# Altium PCB PCB_Gateway.PcbDoc (part 2 of 2)
Units mm, origin at the board's own origin, x right, y up, seen from the top; angles counter-clockwise.
Board outline 107.98 x 107.96 mm, 2 copper layers (Top Layer, Bottom Layer); 168 components, 117 nets, 706 pads, 81 vias.
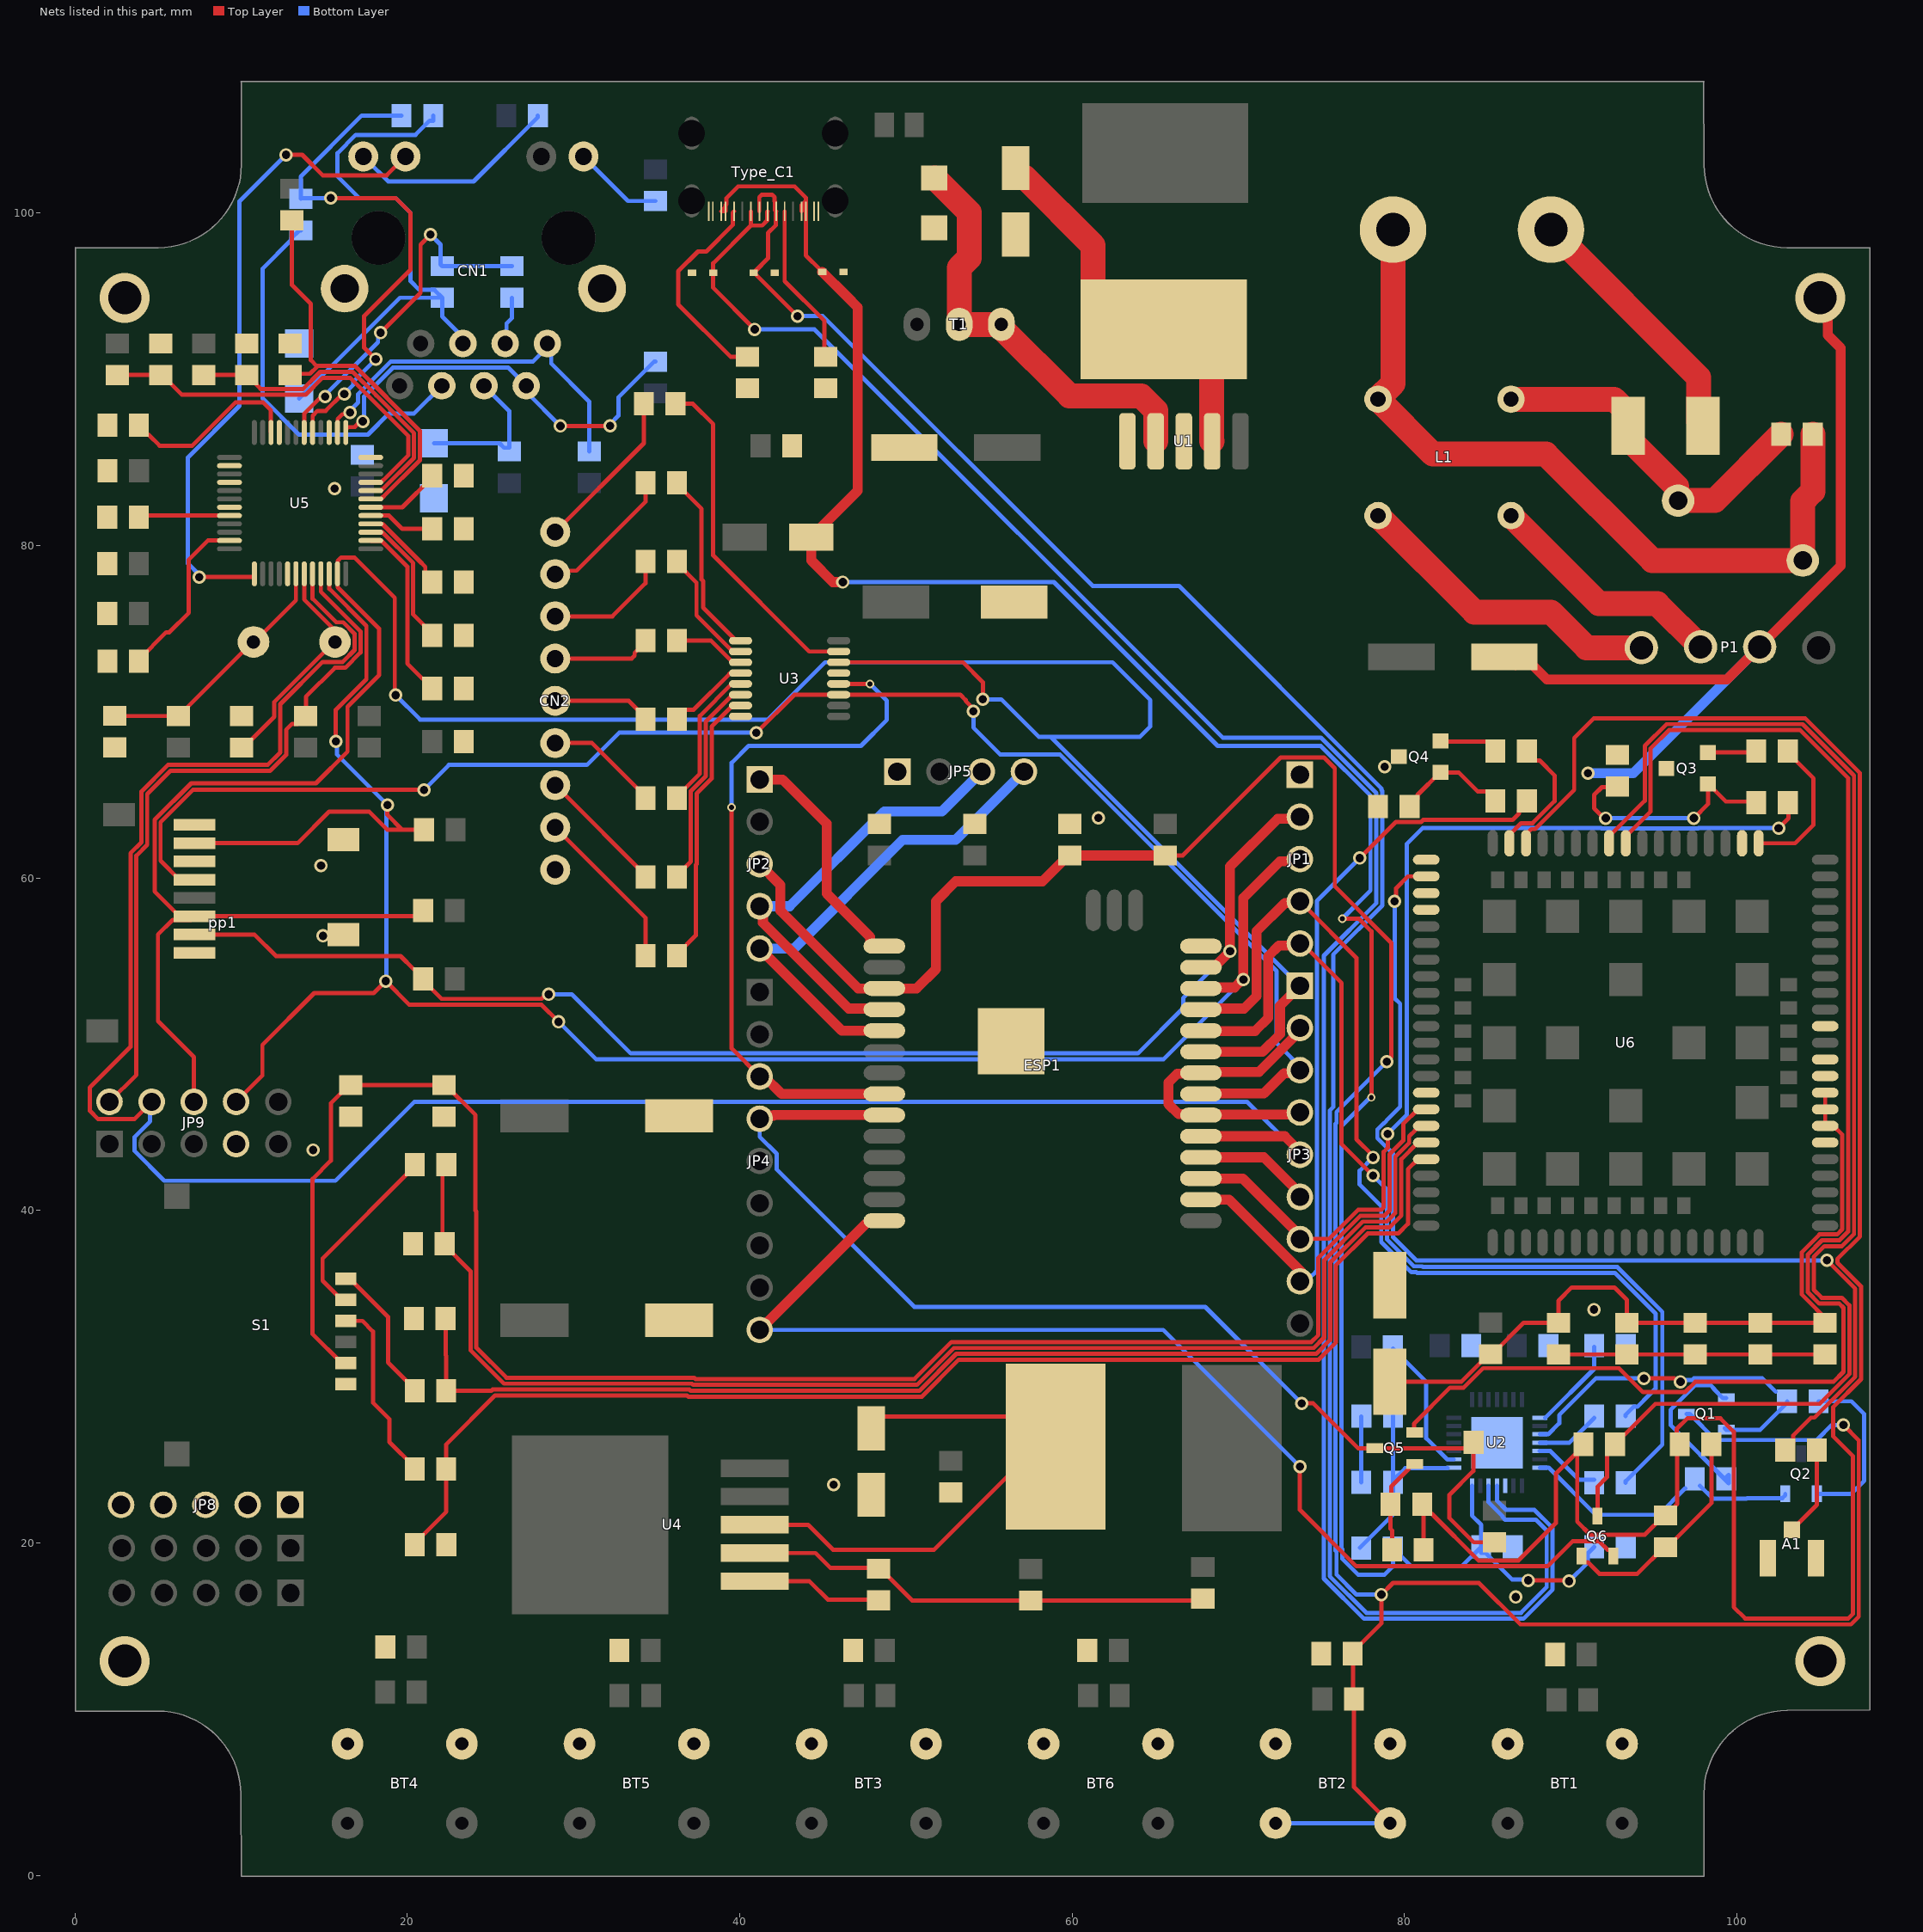
[diagram p2: the nets of this part, all layers, seen from the top]

## Via types
v1: diameter 0.8, hole 0.5, Top Layer to Bottom Layer, tented both sides, 68 vias
v2: diameter 0.5, hole 0.3, Top Layer to Bottom Layer, tented both sides, 9 vias
v3: diameter 3, hole 2, Top Layer to Bottom Layer, tented both sides, 4 vias

## Nets (pads, with @x,y where several pads share a name; then routed paths per layer and width w, separated by ;. In a path a pad name is that pad's centre, name@x,y a point inside that pad or via, vN(x,y) a via of type N, cw(c..) or ccw(c..) an arc to the next point about the centre after c; other vN are vias at no path point) (continued)
CHIP_PU/EN: BT2.2 C6.1 C23.2 ESP1.3 JP2.3 Q1.3 R1.1 R40.1 | length 176.6
  Top Layer w0.254: R1.1@65.599,61.356 R1.1@65.6,61.357 66.657,61.357 72.547,67.247 75.153,67.247 75.8,66.6 75.8,59.5 79.2,56.1 79.2,49.221 v1(78.927,48.948) ; BT2.2@72.24,3.153 BT2.2@72.347,3.153 ; R40.1@76.879,10.471 76.95,10.4 76.95,5.326 78.747,3.529 78.747,3.153 BT2.2@79.123,3.153 ; C23.2@76.879,13.346 76.9,13.325 76.9,10.673 R40.1@76.95,10.623 ; C23.2@76.879,13.446 78.6,15.168 v1(78.6,16.9) 79.3,17.6 84.466,17.6 86.96,15.106 106.846,15.106 107.32,15.58 107.32,26.18 v1(106.4,27.1)
  Top Layer w0.6: JP2.3@41.2,60.84 42.45,59.59 42.45,58.04 47.13,53.36 50.64,53.36 51.8,54.52 51.8,58.6 53,59.8 58.209,59.8 59.763,61.354 C6.1@59.863,61.354 C6.1@59.863,61.354 R1.1@65.599,61.356
  Bottom Layer w0.254: JP2.3@41.14,60.84 JP2.3@41.2,60.84 ; BT2.2@72.24,3.153 BT2.2@79.123,3.153 ; v1(78.6,16.9) 77.102,16.9 75.9,18.102 75.9,19.476 75.846,19.53 75.846,45.213 75.9,45.267 75.9,45.921 v1(78.927,48.948) ; Q1.3@96.949,27.764 97.149,27.764 98.714,26.2 104.8,26.2 105.7,27.1 v1(106.4,27.1)
DTR: Q2.2 R14.1 U2.28 | length 16.2
  Bottom Layer w0.254: U2.28@88.139,24.538 88.662,24.538 91.5,21.7 95.294,21.7 R14.1@96.881,23.288 ; R14.1@97.761,23.454 98.546,22.669 100.569,22.669 100.6,22.7 102.726,22.7 102.899,22.873 Q2.2@102.899,22.964
ESP_PWRKEY: ESP1.17 JP3.7 R57.2 | length 60.4
  Top Layer w0.254: JP3.7@74,38.2 74.102,38.302 75.455,38.302 77.195,40.043 78.589,40.043 78.738,40.192 78.738,43.529 78.987,43.778 v1(78.987,44.613) ; v1(102.5,63) 103.09,63.59 R57.2@103.09,64.539
  Top Layer w0.6: ESP1.17@67.75,41.93 70.27,41.93 JP3.7@74,38.2
  Bottom Layer w0.254: v1(78.987,44.613) 80.14,45.767 80.14,62.06 81.08,63 91.813,63 91.84,62.973 97.66,62.973 97.687,63 v1(102.5,63)
ESP_RESET: ESP1.16 JP3.8 R58.2 | length 47.1
  Top Layer w0.254: JP3.8@73.509,35.931 JP3.8@73.7,35.74 ; v1(77.3,61.2) 79.473,63.373 80.994,63.373 81.121,63.5 86.5,63.5 86.881,63.881 86.881,64.066 86.954,64.139 R58.2@87.554,64.139
  Top Layer w0.6: ESP1.16@67.75,40.66 69.44,40.66 73.809,36.291 JP3.8@73.809,35.851
  Bottom Layer w0.254: JP3.8@74,35.676 74.455,36.131 74.471,36.131 74.727,36.387 74.727,58.627 v1(77.3,61.2)
GND: A1.3 A1.4 BT1.1 BT2.1 BT3.1 BT4.1 BT5.1 BT6.1 C1.2 C2.2 C4.2 C5.2 C6.2 C7.2 C8.1 C9.2 C10.2 C11.1 C13.2 C14.2 C15.2 C16.2 C17.2 C19.2 C20.2 C21.2 C22.1 C23.1 C24.1 C26.2 C27.1 C28.1 C29.1 C30.1 C31.1 C32.1 C33.2 C34.2 C35.2 C36.2 C37.2 C38.2 C39.2 C40.2 C41.2 C45.2 C46.2 C47.2 C48.2 C49.2 CN1.SHELL1 CN1.SHELL2 CN2.9 D2.1 D3.1 D4.1 D5.1 D6.1 ESP1.1 ESP1.28 ESP1.29 JP1.1 JP2.1 JP5.1 JP8.1 JP8.2 JP8.3 JP8.4 JP8.5 JP9.4 P1.2 pp1.1 pp1.6 pp1.8 pp1.9 pp1.10 Q3.2 Q4.2 R2.1 R3.1 R6.1 R26.1 R27.1 R29.2 R30.2 R31.2 R32.2 R33.2 R34.2 R35.1 R37.1 R48.1 R52.1 R59.2 R60.2 R68.1 S1.2 Type_C1.A1 Type_C1.A12 Type_C1.B1 Type_C1.B12 U1.3 U1.5 U2.3 U2.29 U3.8 U3.13 U4.1 U5.3 U5.9 U5.14 U5.16 U5.19 U5.29 U5.48 U6.2 U6.18 U6.29 U6.54 U6.58 U6.59 U6.61 U6.89 U6.91 | length 97.4
  Top Layer w0.254: U4.1@40.9,17.7 44.2,17.7 45.3,16.6 48.315,16.6 R68.1@48.361,16.554 ; C4.2@86,73.3 C4.2@86.673,72.627 ; C38.2@89.257,31.346 89.257,31.357 89.269,31.346 C37.2@93.367,31.346 C36.2@97.477,31.346 C40.2@105.697,31.346
  Top Layer w0.6: JP2.1@41.2,65.92 42.58,65.92 45.23,63.27 45.23,59.07 47.843,56.457 47.843,56.039 47.981,55.9 ESP1.1@48.7,55.9 ; C4.2@86,73.3 87.2,73.3 88.56,71.94 99.396,71.94 P1.2@101.356,73.9 106.24,78.784 106.24,91.88 105.459,92.661 105.459,94.441 v3(105,94.9)
  Bottom Layer w0.254: C19.2@77.395,23.661 R26.1@77.395,27.619
  Bottom Layer w0.6: v1(91.03,66.3) 93.756,66.3 P1.2@101.356,73.9
  other v1: 86.69,16.75 45.64,23.51 91.385,34.045 14.33,43.64 14.93,56.52 14.81,60.74 61.58,63.61 78.8,66.69 15.63,83.42
  other v3: 3,12.9 105,12.9 3,94.9
GNSS_ANT: C42.2 U6.90 | length 64.9
  Top Layer w0.254: v1(79.4,58.6) 79.481,58.681 79.481,59.381 80.2,60.1 U6.90@81.3,60.1 ; C42.2@102.9,25.6 103.365,26.065 103.365,26.465 104.446,27.546 104.647,27.546 107.108,30.007 107.108,35.292 v1(105.4,37)
  Bottom Layer w0.254: v1(79.4,58.6) 79.4,52.769 79.727,52.442 79.727,46.24 78.9,45.413 78.9,45.389 78.751,45.24 78.727,45.24 78.36,44.873 78.36,44.354 79.3,43.413 79.3,38.4 80.7,37 v1(105.4,37)
IO27: ESP1.18 JP3.6 | length 7.3
  Top Layer w0.6: ESP1.18@67.75,43.2 71.54,43.2 JP3.6@74,40.74
Latch: ESP1.8 JP4.3 U3.12 | length 42.4
  Top Layer w0.254: v2(39.51,64.249) 39.51,49.75 JP4.3@41.2,48.06 ; U3.12@45.95,71.675 v2(47.835,71.675)
  Top Layer w0.6: JP4.3@41.2,48.06 41.471,48.06 42.521,47.01 ESP1.8@48.7,47.01
  Bottom Layer w0.254: v2(39.51,64.249) 39.51,66.93 40.53,67.95 47.29,67.95 48.85,69.51 48.85,70.66 v2(47.835,71.675)
LINKLED: CN1.11 U5.25 | length 39.8
  Top Layer w0.254: v1(7.481,78.1) 10.779,78.1 10.8,78.121 U5.25@10.8,78.3 ; v1(12.7,103.5) 13.671,103.5 14.9,102.271 18.761,102.271 CN1.11@19.89,103.4
  Bottom Layer w0.254: v1(7.481,78.1) 7.481,78.241 6.8,78.922 6.8,85.3 9.9,88.4 9.9,100.7 v1(12.7,103.5)
NC: ESP1.20 ESP1.22 JP3.2 JP3.4 | length 19
  Top Layer w0.6: JP3.2@73.689,50.789 71.237,48.337 67.807,48.337 ESP1.22@67.75,48.28 67.693,48.223 66.323,48.223 65.8,47.7 65.8,46.4 66.403,45.797 67.693,45.797 ESP1.20@67.75,45.74 67.79,45.78 73.96,45.78 JP3.4@74,45.82
NetA1_2: A1.2 C42.1 | length 5.4
  Top Layer w0.254: A1.2@103.3,20.8 104.8,22.3 C42.1@104.8,25.6
NetC3_1: C3.1 F1.2 L1.3 MOV1.1 | length 21.8
  Top Layer w1.5: L1.3@86.4,88.8 92.6,88.8 93.45,87.95 F1.2@93.45,87.2 93.45,86.45 96.363,83.537 96.363,82.787 MOV1.1@96.45,82.7 98.658,82.7 C3.1@102.654,86.697
NetC3_2: C3.2 HB1.2 L1.1 MOV1.2 | length 48
  Top Layer w1.5: HB1.2@79.3,99 79.3,89.741 78.4,88.841 L1.1@78.4,88.8 81.7,85.5 88.5,85.5 94.9,79.1 MOV1.2@103.95,79.1 103.95,82.658 104.554,83.262 C3.2@104.554,86.697
NetC10_1: C10.1 U2.22 | length 5.5
  Bottom Layer w0.254: U2.22@88.462,27.538 91.404,30.479 C10.1@91.404,31.804
NetC19_1: C19.1 R24.2 R26.2 U2.8 | length 12.3
  Bottom Layer w0.254: R24.2@77.304,19.715 79.295,21.706 79.295,23.761 80.034,24.5 U2.8@82.599,24.5 ; C19.1@79.301,23.767 R26.2@79.301,27.625
NetC25_2: C25.2 R42.1 R68.2 U4.2 | length 28.2
  Top Layer w0.254: U4.2@40.9,19.4 44.562,19.4 45.462,18.5 48.315,18.5 R68.2@48.361,18.454 48.461,18.454 50.37,16.546 C25.2@57.497,16.546 67.752,16.546 R42.1@67.861,16.654
NetC34_1: C34.1 U5.20 | length 5.5
  Top Layer w0.254: C34.1@3.846,81.703 3.942,81.8 7.6,81.8 U5.20@9.3,81.8
NetC36_1: C36.1 C37.1 C38.1 C39.1 C40.1 C41.1 R54.1 U6.55 U6.56 U6.57 | length 48.4
  Top Layer w0.254: C39.1@79.1,29.7 83.406,29.7 85.061,31.354 R54.1@85.161,31.354 85.261,31.354 87.152,33.246 C38.1@89.257,33.246 89.257,34.577 90.05,35.37 92.62,35.37 93.367,34.623 C37.1@93.367,33.246 C36.1@97.477,33.246 101.587,33.246 105.697,33.246 105.597,33.246 103.9,34.942 103.9,37.5 104.963,38.563 106.018,38.563 106.327,38.871 106.327,39.927 106.327,44.562 105.8,45.089 U6.55@105.3,45.089 U6.56@105.3,46.089 U6.57@105.3,47.089
NetC43_2: C43.2 Q5.1 R61.1 | length 5.9
  Top Layer w0.254: C43.2@79.246,19.603 79.246,20.754 79.154,20.846 R61.1@79.154,22.339 79.2,22.385 79.2,23.4 80.227,24.427 80.227,24.577 80.4,24.75 Q5.1@80.6,24.75
NetC50_1: C50.1 Q6.1 R67.2 | length 13.7
  Top Layer w0.254: Q6.1@90.65,19.217 90.65,19.017 90.823,18.844 91.023,18.844 91.716,18.151 94,18.151 95.649,19.8 95.658,19.8 C50.1@95.703,19.754 95.803,19.754 98.454,22.405 R67.2@98.454,25.939
NetCN1_9: CN1.9 R4.2 | length 5.4
  Bottom Layer w0.254: CN1.9@30.6,103.4 33.276,100.724 R4.2@34.932,100.724
NetCN1_12: CN1.12 R5.2 | length 13
  Bottom Layer w0.254: CN1.12@17.3,103.4 CN1.12@17.35,103.4 17.35,103.15 17.6,103.15 18.85,101.9 23.994,101.9 27.854,105.761 R5.2@27.854,105.861
NetCN2_1: CN2.1 R10.2 | length 9.9
  Top Layer w0.254: CN2.1@28.9,80.82 34.229,86.149 R10.2@34.229,88.521
NetCN2_2: CN2.2 R12.2 | length 8.4
  Top Layer w0.254: CN2.2@28.9,78.28 29.103,78.483 30.183,78.483 34.329,82.629 R12.2@34.329,83.778
NetCN2_3: CN2.3 R13.2 | length 7.6
  Top Layer w0.254: CN2.3@28.9,75.74 32.34,75.74 34.329,77.729 R13.2@34.329,79.035
NetCN2_4: CN2.4 R16.2 | length 6
  Top Layer w0.254: CN2.4@28.9,73.2 33.5,73.2 33.677,73.377 33.677,73.539 34.329,74.192 R16.2@34.329,74.292
NetCN2_5: CN2.5 R17.2 | length 5.9
  Top Layer w0.254: CN2.5@28.9,70.66 33.318,70.66 34.329,69.649 R17.2@34.329,69.549
NetCN2_6: CN2.6 R18.2 | length 7.4
  Top Layer w0.254: CN2.6@28.9,68.12 29.319,68.12 29.58,67.859 29.58,68.164 29.616,68.2 29.616,68.12 31.116,68.12 34.329,64.906 R18.2@34.329,64.806
NetCN2_7: CN2.7 R20.2 | length 8
  Top Layer w0.254: CN2.7@28.9,65.58 29.22,65.58 29.22,65.273 34.329,60.163 R20.2@34.329,60.063
NetCN2_8: CN2.8 R22.2 | length 10
  Top Layer w0.254: CN2.8@28.9,63.04 34.329,57.611 R22.2@34.329,55.321
NetD5_2: D5.2 L2.1 U1.2 | length 23.7
  Top Layer w1.5: D5.2@56.6,102.7 56.6,102.2 56.675,102.125 57.175,102.125 61.25,98.05 61.25,95.25 63.5,93 66.998,93 68.4,91.598 68.4,86.288 U1.2@68.419,86.269
NetD6_2: D6.2 L12.1 U4.3 | length 35.4
  Top Layer w0.254: U4.3@39.375,21.1 U4.3@40.9,21.1 44.112,21.1 45.612,19.6 51.7,19.6 56.068,23.968 57.068,23.968 59.3,26.2 57.9,27.6 48.3,27.6 D6.2@47.9,27.2
NetF1_1: F1.1 HB1.1 | length 15.6
  Top Layer w1.5: HB1.1@88.8,99 97.7,90.1 97.7,87.45 F1.1@97.95,87.2
NetL1_2: L1.2 P1.4 | length 19.1
  Top Layer w1.5: L1.2@78.4,81.8 84.2,76 88.8,76 90.948,73.852 P1.4@94.244,73.852
NetL1_4: L1.4 P1.3 | length 14.7
  Top Layer w1.5: L1.4@86.4,81.8 91.7,76.5 95.2,76.5 P1.3@97.8,73.9
NetQ1_1: Q1.1 R14.2 | length 10.9
  Bottom Layer w0.254: Q1.1@99.349,28.714 99.149,28.714 98.617,29.247 98.617,29.283 98.4,29.5 97.5,29.5 96,28 96,27.1 99.5,23.6 99.5,24.106 R14.2@99.354,23.961
NetQ2_1: Q2.1 R21.2 | length 10.2
  Bottom Layer w0.254: Q2.1@104.799,22.964 106.864,22.964 107.646,23.746 107.646,27.754 106.875,28.525 R21.2@104.904,28.525
NetQ3_1: Q3.1 R57.1 R59.1 | length 14.4
  Top Layer w0.254: v1(92.1,63.6) 92,63.6 91.4,64.2 91.4,65 91.868,65.468 92.768,65.468 R59.1@92.8,65.5 ; v1(97.4,63.6) 98.25,64.45 Q3.1@98.25,65.65 98.275,65.65 99.325,64.6 101.094,64.6 R57.1@101.154,64.539
  Bottom Layer w0.254: v1(92.1,63.6) v1(97.4,63.6)
NetQ3_3: Q3.3 R55.1 | length 2.9
  Top Layer w0.254: Q3.3@98.25,67.55 101.065,67.55 R55.1@101.154,67.639
NetQ4_1: Q4.1 R58.1 R60.1 | length 6.9
  Top Layer w0.254: R60.1@80.3,64.3 80.773,64.773 80.773,64.998 82.125,66.35 Q4.1@82.15,66.35 83.25,66.35 84.388,65.212 84.981,65.212 85.454,64.739 R58.1@85.454,64.639
NetQ4_3: Q4.3 R56.1 | length 3.8
  Top Layer w0.254: Q4.3@82.15,68.25 82.2,68.2 85.094,68.2 R56.1@85.654,67.639
NetR2_2: R2.2 Type_C1.A5 | length 9.8
  Top Layer w0.254: Type_C1.A5@42.7,100.1 42.7,95.9 45.1,93.5 45.1,91.415 R2.2@45.161,91.354
NetR3_2: R3.2 Type_C1.B5 | length 12.7
  Top Layer w0.254: Type_C1.B5@39.652,100.1 39.575,100.023 39.575,99.275 37.987,97.687 37.488,97.687 36.3,96.499 36.3,94.5 39.446,91.354 R3.2@40.461,91.354
NetR6_2: R6.2 T1.2 T1.3 U1.4 | length 25.9
  Top Layer w1.5: R6.2@51.7,102.1 51.75,102.1 53.8,100.05 53.8,97.3 53.2,96.7 T1.2@53.2,93.3 T1.3@55.74,93.3 55.74,93.1 59.84,89 64.14,89 65.019,88.121 U1.4@65.019,86.269
NetR7_1: R7.1 U2.26 | length 4
  Bottom Layer w0.254: U2.26@88.109,25.538 88.762,25.538 90.501,23.799 R7.1@91.401,23.799
NetR8_1: R8.1 U2.25 | length 3.9
  Bottom Layer w0.254: U2.25@88.139,26.038 89.914,26.038 R8.1@91.401,27.525
NetR10_1: R10.1 U3.15 | length 20.6
  Top Layer w0.254: R10.1@36.129,88.521 37.179,88.521 38.4,87.3 38.4,79.4 44.175,73.625 U3.15@45.95,73.625
NetR12_1: R12.1 U3.1 | length 11.2
  Top Layer w0.254: R12.1@36.229,83.778 36.229,83.678 37.7,82.207 37.7,77.965 37.8,77.865 37.8,76.268 39.793,74.275 U3.1@40.05,74.275
NetR13_1: R13.1 U3.2 | length 7.3
  Top Layer w0.254: R13.1@36.229,79.035 36.229,78.935 37.4,77.764 37.4,75.8 39.575,73.625 U3.2@40.05,73.625
NetR16_1: R16.1 U3.3 | length 4.4
  Top Layer w0.254: R16.1@36.229,74.292 38.258,74.292 39.575,72.975 U3.3@40.05,72.975
NetR17_1: R17.1 U3.4 | length 5
  Top Layer w0.254: R17.1@36.229,69.549 36.229,69.649 36.702,70.122 37.222,70.122 39.387,72.287 40.012,72.287 U3.4@40.05,72.325
NetR18_1: R18.1 U3.5 | length 8.8
  Top Layer w0.254: R18.1@36.229,64.806 36.229,64.906 37.6,66.277 37.6,69.753 39.522,71.675 U3.5@40.05,71.675
NetR20_1: R20.1 U3.6 | length 12.9
  Top Layer w0.254: R20.1@36.229,60.063 36.229,60.163 37.056,60.99 37.056,65.233 37.954,66.13 37.954,69.404 39.525,70.975 39.525,71.025 U3.6@40.05,71.025
NetR22_1: R22.1 U3.7 | length 16.9
  Top Layer w0.254: R22.1@36.229,55.321 36.229,55.421 37.35,56.541 37.35,60.784 37.41,60.844 37.41,65.086 38.308,65.984 38.308,69.108 39.575,70.375 U3.7@40.05,70.375
NetR25_1: R25.1 U2.9 | length 8.4
  Bottom Layer w0.254: R25.1@79.296,31.7 81.3,29.696 81.3,26.299 82.561,25.038 U2.9@82.959,25.038
NetR29_1: R29.1 U5.42 | length 4.5
  Top Layer w0.254: U5.42@17.8,82.3 19.7,82.3 21.5,84.1 R29.1@21.5,84.2
NetR30_1: R30.1 U5.41 | length 4
  Top Layer w0.254: U5.41@17.8,81.8 18.9,81.8 19.7,81 R30.1@21.5,81
NetR31_1: R31.1 U5.40 | length 5.4
  Top Layer w0.254: U5.40@17.8,81.3 17.809,81.291 18.509,81.291 20.708,79.093 21.085,78.715 21.085,78.215 R31.1@21.5,77.8
NetR32_1: R32.1 U5.39 | length 8.1
  Top Layer w0.254: U5.39@17.8,80.8 17.809,80.791 18.509,80.791 20.354,78.946 20.354,75.846 21.5,74.7 R32.1@21.5,74.6
NetR33_1: R33.1 U5.38 | length 10.9
  Top Layer w0.254: U5.38@17.8,80.3 17.809,80.291 18.442,80.291 18.556,80.177 20,78.733 20,72.9 20.927,71.973 21.027,71.973 21.5,71.5 R33.1@21.5,71.4
NetR48_2: R48.2 U5.10 | length 11.1
  Top Layer w0.254: R48.2@3.854,87.239 3.854,87.139 4.327,86.666 4.427,86.666 5.094,86 7.06,86 9.66,88.6 11.327,88.6 11.791,88.136 11.791,86.809 U5.10@11.8,86.8
NetR52_2: R52.2 U5.23 | length 10.4
  Top Layer w0.254: R52.2@3.854,73.039 3.854,73.139 5.498,74.783 5.683,74.783 6.854,75.954 6.854,79.154 8,80.3 U5.23@9.3,80.3
NetR63_2: R63.2 S1.6 | length 11.9
  Top Layer w0.254: S1.6@16.3,34.63 16.05,34.63 14.9,35.78 14.9,37.115 20.446,42.661 R63.2@20.446,42.761 20.446,42.861 R63.2@19.973,43.334
NetR64_2: R64.2 S1.5 | length 8.6
  Top Layer w0.254: S1.5@16.3,35.9 16.55,35.9 16.798,35.652 18.848,33.602 18.848,30.855 20.443,29.261 R64.2@20.443,29.161
NetR65_2: R65.2 S1.3 | length 11.2
  Top Layer w0.254: S1.3@16.3,33.36 17.3,33.36 17.935,32.725 17.935,28.445 18.92,27.46 18.92,26.084 20.443,24.561 R65.2@20.443,24.461
PMODE0: R27.2 R28.1 U5.45 | length 24
  Top Layer w0.254: R28.1@2.561,90.254 5.251,90.254 6.44,89.065 13.88,89.065 14.907,90.092 16.563,90.092 17.775,88.881 18.806,87.849 20.052,86.603 20.052,85.419 18.556,83.923 18.535,83.923 18.412,83.8 U5.45@17.8,83.8
PMODE1: R35.2 R36.1 U5.44 | length 19.9
  Top Layer w0.254: R36.1@7.747,90.254 10.437,90.254 10.919,89.773 10.919,89.673 11.173,89.419 13.733,89.419 14.761,90.446 16.71,90.446 18.129,89.027 18.952,88.203 20.406,86.75 20.406,85.272 18.557,83.423 18.535,83.423 18.412,83.3 U5.44@17.8,83.3
PMODE2: R37.2 R38.1 U5.43 | length 24.8
  Top Layer w0.254: R37.2@12.939,90.246 13.021,90.327 14.141,90.327 14.614,90.8 ; R38.1@13.061,99.554 13.061,95.669 14.2,94.53 14.2,91.149 14.549,90.8 14.614,90.8 ; U5.43@17.8,82.8 18.412,82.8 18.535,82.923 18.557,82.923 20.76,85.126 20.76,86.897 19.099,88.557 18.483,89.174 16.857,90.8 14.614,90.8
PWRKEY: R55.2 U6.1 | length 8.8
  Top Layer w0.254: U6.1@101.3,62.089 103.489,62.089 104.6,63.2 104.6,65.994 103.054,67.539 R55.2@103.054,67.639
RCT: C17.1 CN1.5 R19.2 R23.2 | length 34.4
  Bottom Layer w0.254: C17.1@13.5,88.85 19.556,94.906 R19.2@22.105,94.906 ; R23.2@21.554,105.861 21.554,105.554 21.348,105.554 20.494,104.7 16.9,104.7 15.8,103.6 15.8,102.2 17.1,100.9 19.3,100.9 20.2,100 20.2,95.9 20.721,95.379 21.632,95.379 R19.2@22.105,94.906 ; CN1.5@23.345,92.15 23.345,92.528 22.105,93.768 R19.2@22.105,94.906
RESET: R56.2 U6.16 | length 7.9
  Top Layer w0.254: U6.16@86.3,62.089 86.3,62.589 87.011,63.3 87.7,63.3 89.016,64.616 89.016,66.177 88.12,67.074 87.827,67.074 87.554,67.347 R56.2@87.554,67.639
RTS: Q1.2 R21.1 U2.24 | length 20.9
  Top Layer w0.254: v1(94.4,29.9) 96.252,29.9 96.452,29.7 v1(96.6,29.7)
  Bottom Layer w0.254: U2.24@88.139,26.538 88.638,26.538 89.3,27.2 89.3,27.7 91.5,29.9 v1(94.4,29.9) ; v1(96.6,29.7) 96.704,29.804 97.304,29.804 97.399,29.9 101.529,29.9 102.331,29.098 ; Q1.2@99.253,26.91 Q1.2@99.349,26.814 101.393,26.814 103.004,28.425 R21.1@103.004,28.525
RX0: ESP1.24 JP1.5 R7.2 | length 59.8
  Top Layer w0.254: JP1.5@73.957,55.934 76.205,53.686 76.205,43.995 v1(78.1,42.1)
  Top Layer w0.6: ESP1.24@67.75,50.82 67.77,50.8 71,50.8 71.8,51.6 71.8,55.3 72.434,55.934 JP1.5@73.957,55.934
  Bottom Layer w0.254: v1(78.1,42.1) 78.946,41.254 78.946,38.253 80.553,36.646 81.054,36.646 81.1,36.6 92.8,36.6 95.5,33.9 95.5,25.924 93.301,23.725 R7.2@93.301,23.625
RXD_A7677: Q6.3 R66.2 U6.10 | length 81.3
  Top Layer w0.254: Q6.3@91.6,21.617 91.6,23.387 92.181,23.969 92.181,25.366 92.261,25.446 92.654,25.446 R66.2@92.654,25.939 92.654,26.039 93.127,26.512 93.227,26.512 95.085,28.37 104.971,28.37 106.754,30.153 106.754,34.298 106.298,34.754 105.089,34.754 104.608,35.235 104.608,37.207 105.256,37.855 106.311,37.855 107.035,38.578 107.035,66.165 103.947,69.254 95.753,69.254 94.446,67.947 94.446,64.646 92.3,62.5 U6.10@92.3,62.089
RXD_MCU: C44.2 ESP1.9 JP4.4 Q5.3 R62.1 | length 68.5
  Top Layer w0.254: v1(73.8,28.4) 74.5,28.4 77.2,25.7 Q5.3@78.2,25.7 83.798,25.7 R62.1@84.154,26.056 ; R62.1@84.128,26 84.128,24.328 82.7,22.9 82.7,21.5 84.154,20.046 C44.2@85.397,20.046
  Top Layer w0.6: JP4.4@41.2,45.52 41.391,45.711 42.023,45.711 42.051,45.74 ESP1.9@48.7,45.74
  Bottom Layer w0.254: JP4.4@41.2,45.52 41.2,44.432 42.227,43.405 42.227,42.473 50.5,34.2 68,34.2 v1(73.8,28.4)
RXN: C18.2 R23.1 U5.5 | length 32.5
  Top Layer w0.254: U5.5@14.3,86.8 14.309,86.809 14.309,87.808 14.601,88.1 15.086,88.1 16.106,89.12 v1(16.21,89.12) ; v1(15.4,100.9) 19.3,100.9 20.2,100 20.2,96.6 17.4,93.8 17.4,91.9 18,91.3 18,91.2 v1(18.1,91.2)
  Bottom Layer w0.254: v1(15.4,100.9) 13.642,100.9 C18.2@13.597,100.854 13.597,102.197 17.261,105.861 R23.1@19.654,105.861 ; v1(16.21,89.12) 16.21,89.13 16.757,89.677 16.757,89.857 17.408,90.508 v1(18.1,91.2)
RXNNET: C18.1 CN1.6 | length 24
  Bottom Layer w0.254: C18.1@13.597,98.954 13.497,98.954 13.024,98.481 13.024,98.381 11.3,96.658 11.3,88.849 13.479,86.67 17.63,86.67 18.9,87.94 20.405,87.94 CN1.6@22.075,89.61
RXP: C12.2 R19.1 U5.6 | length 21.6
  Top Layer w0.254: U5.6@13.8,86.8 13.8,87.931 14.73,88.861 14.96,88.861 v1(15.065,88.965) ; v1(18.4,92.8) 20.8,95.2 20.8,98.1 v1(21.4,98.7)
  Bottom Layer w0.254: v1(15.065,88.965) 15.065,89.051 18.239,92.225 18.239,92.491 18.4,92.652 v1(18.4,92.8) ; v1(21.4,98.7) 22,98.1 22,96.911 R19.1@22.105,96.806 26.294,96.806 C12.2@26.3,96.8
RXPNET: C12.1 CN1.3 | length 2.9
  Bottom Layer w0.254: CN1.3@25.885,92.15 25.885,92.285 25.971,92.371 25.971,93.356 26.3,93.685 C12.1@26.3,94.9
SCL: ESP1.5 JP2.5 JP5.4 | length 29.9
  Top Layer w0.6: JP2.5@41.2,55.76 46.14,50.82 ESP1.5@48.7,50.82
  Bottom Layer w0.6: JP2.5@41.2,55.76 43.26,55.76 49.8,62.3 53,62.3 JP5.4@57.1,66.4
SD_CS: ESP1.27 JP1.2 pp1.2 R49.1 | length 81.4
  Top Layer w0.254: pp1.2@7.2,56.6 10.8,56.6 12.1,55.3 19.594,55.3 20.381,54.512 20.481,54.512 20.954,54.039 R49.1@20.954,53.939 20.954,53.839 22.063,52.731 28.079,52.731 28.352,53.004 v1(28.5,53.004)
  Top Layer w0.6: ESP1.27@67.75,54.63 68.54,54.63 69.498,55.588 v1(69.498,55.598) ; v1@69.5,55.6 69.498,55.602 69.498,60.698 72.354,63.554 JP1.2@73.957,63.554
  Bottom Layer w0.254: v1(28.5,53.004) 28.504,53 29.9,53 33.446,49.454 63.954,49.454 66.674,52.174 66.674,52.774 v1(69.498,55.598)
SDA: ESP1.4 JP2.4 JP5.3 | length 27.3
  Top Layer w0.6: JP2.4@41.2,58.3 41.391,58.109 41.391,57.309 46.553,52.147 48.643,52.147 ESP1.4@48.7,52.09
  Bottom Layer w0.6: JP2.4@41.2,58.3 43,58.3 48.7,64 52.16,64 JP5.3@54.56,66.4
SPI_MISO: ESP1.26 JP1.3 JP9.7 pp1.7 R53.1 U5.34 | length 125.3
  Top Layer w0.254: pp1.7@7.2,62.1 13.4,62.1 15.3,64 17.7,64 18.8,62.9 19.7,62.9 ; JP9.7@9.7,46.54 9.7,46.6 9.76,46.6 11.282,48.122 11.282,49.964 14.395,53.077 17.977,53.077 v1(18.7,53.8) 20.123,52.377 28.075,52.377 v1(29.102,51.35) ; U5.34@15.3,78.3 15.3,77.8 15.309,77.791 15.309,77.391 17.537,75.163 17.537,71.954 15.7,70.117 v1(15.7,68.216) ; v1(18.8,64.4) 18.8,63.8 19.7,62.9 ; R53.1@21,62.9 19.7,62.9
  Top Layer w0.6: ESP1.26@67.75,53.36 67.807,53.417 69.763,53.417 70.246,53.9 v1(70.3,53.9) 70.3,58.8 72.5,61 73.943,61 JP1.3@73.957,61.014
  Bottom Layer w0.254: v1(15.7,68.216) 15.765,68.15 15.765,67.435 v1(18.8,64.4) 18.75,64.35 18.75,53.85 v1(18.7,53.8) ; v1(29.102,51.35) 31.352,49.1 65.5,49.1 v1(70.3,53.9)
SPI_MOSI: ESP1.23 JP3.1 JP9.8 pp1.3 R50.1 U3.14 U5.35 | length 173.2
  Top Layer w0.254: JP9.8@7.16,46.54 7.16,49.24 5,51.4 5,56.6 5.877,57.477 6.977,57.477 pp1.3@7.2,57.7 ; v1(19.3,71) 19.246,71.054 19.246,76.854 16.823,79.277 16.018,79.277 15.809,79.068 15.809,78.309 U5.35@15.8,78.3 15.809,78.291 15.809,77.491 18.3,74.999 18.3,72.2 16.4,70.3 16.4,67.6 14.5,65.7 7,65.7 4.8,63.5 4.8,59.2 6.3,57.7 pp1.3@7.2,57.7 ; R50.1@20.781,57.912 20.569,57.7 pp1.3@7.2,57.7 ; R50.1@20.8,58.194 R50.1@20.954,58.039 ; U3.14@45.95,72.975 53.425,72.975 54.628,71.772 v1(54.628,70.75)
  Top Layer w0.6: ESP1.23@67.75,49.55 71.45,49.55 72.5,50.6 72.5,52.32 JP3.1@73.62,53.44
  Bottom Layer w0.254: v1(19.3,71) 20.769,69.531 41.689,69.531 45.134,72.977 62.423,72.977 64.7,70.7 64.7,69.118 64.082,68.5 58.709,68.5 57.983,68.5 55.733,70.75 v1(54.628,70.75) ; 58.709,68.491 73.007,54.193 73.247,54.193 JP3.1@74,53.44
SPI_SCK: ESP1.21 JP3.3 pp1.5 U3.11 | length 96.3
  Top Layer w0.254: pp1.5@7.2,59.9 6.3,59.9 5.154,61.046 5.154,63.353 7.101,65.3 v1(21,65.3) ; v1(41,68.74) 43.285,71.025 53.275,71.025 53.592,70.708 53.592,70.648 54.056,70.185 v1(54.056,70.037)
  Top Layer w0.6: ESP1.21@67.75,47.01 67.775,47.035 71.535,47.035 72.749,48.249 73.889,48.249 JP3.3@74,48.36
  Bottom Layer w0.254: v1(21,65.3) 22.5,66.8 30.804,66.8 32.744,68.74 v1(41,68.74) ; v1(54.056,70.037) 54.056,69.044 55.673,67.427 59.272,67.427 72.3,54.399 72.3,50.06 JP3.3@74,48.36
SPI_SCLK: JP9.10 R44.1 U5.33 | length 43.1
  Top Layer w0.254: JP9.10@2.08,46.54 3.7,48.16 3.7,61.343 4.354,61.997 4.354,65.053 5.747,66.446 11.747,66.446 12.708,67.407 12.708,68.908 13.07,69.27 13.406,69.27 13.9,69.764 13.9,70.899 15.647,72.646 16.265,72.646 17.183,73.565 17.183,74.835 14.8,77.219 U5.33@14.8,78.3
TCT: C11.2 CN1.4 R15.2 | length 9
  Bottom Layer w0.254: C11.2@21.6,86.15 25.544,86.15 25.814,85.88 26.139,85.88 26.139,88.086 CN1.4@24.615,89.61
TX0: ESP1.25 JP1.4 R8.2 | length 59.5
  Top Layer w0.254: JP1.4@73.957,58.474 73.957,58.343 77.1,55.2 77.1,44.288 78.1,43.288 v1(78.1,43.2)
  Top Layer w0.6: ESP1.25@67.75,52.09 67.807,52.147 70.347,52.147 71.1,52.9 71.1,56.8 72.8,58.5 73.931,58.5 JP1.4@73.957,58.474
  Bottom Layer w0.254: v1(78.1,43.2) 77.289,42.389 77.289,41.567 78.592,40.264 78.592,38.107 80.407,36.292 80.708,36.292 80.754,36.246 92.653,36.246 95.1,33.799 95.1,29.3 94.7,28.9 93.998,28.198 93.774,28.198 93.301,27.725 R8.2@93.301,27.625
TXD_A7677: Q5.2 U6.9 | length 87.7
  Top Layer w0.254: Q5.2@80.5,26.65 80.57,26.72 80.57,27.182 82.733,29.346 83.553,29.346 84.726,30.519 92.895,30.519 94.34,29.073 96.86,29.073 97.487,29.7 105.8,29.7 106.4,30.3 106.4,34.151 106.151,34.4 104.943,34.4 104.254,35.089 104.254,37.353 105.109,38.209 106.165,38.209 106.681,38.725 106.681,66.019 103.8,68.9 95.9,68.9 94.8,67.8 94.8,64 93.3,62.5 U6.9@93.3,62.089
TXD_MCU: ESP1.14 JP4.9 Q6.2 | length 70.1
  Top Layer w0.254: v1(73.7,24.6) 73.7,22 77.1,18.6 88.6,18.6 90.1,20.1 91.7,20.1 92.21,19.59 92.377,19.59 92.55,19.417 Q6.2@92.55,19.217
  Top Layer w0.6: JP4.9@41.2,32.82 47.62,39.24 47.669,39.24 47.819,39.39 ESP1.14@48.7,39.39
  Bottom Layer w0.254: JP4.9@41.2,32.82 65.48,32.82 v1(73.7,24.6)
TXN: CN1.2 R11.2 U5.1 | length 25.2
  Top Layer w0.254: U5.1@16.3,86.8 16.3,87.109 16.447,87.117 16.845,87.139 16.958,87.252 17.173,87.467 v1(17.321,87.467) ; v1(29.211,87.189) 29.217,87.194 32.194,87.194 v1(32.2,87.2)
  Bottom Layer w0.254: v1(17.321,87.467) 17.4,87.546 17.4,88.964 19.136,90.7 26.065,90.7 CN1.2@27.155,89.61 27.155,89.245 v1(29.211,87.189) ; v1(32.2,87.2) 32.2,87.304 32.7,87.804 32.7,88.915 34.839,91.054 R11.2@34.939,91.054
TXP: CN1.1 R9.2 U5.2 | length 23.3
  Top Layer w0.254: U5.2@15.8,86.8 15.809,86.809 15.809,87.609 16.095,87.895 16.447,87.895 v1(16.551,87.999)
  Bottom Layer w0.254: v1(16.551,87.999) 16.551,88.116 17.046,88.61 17.046,89.111 18.989,91.054 27.554,91.054 28.425,91.925 CN1.1@28.425,92.15 28.657,91.918 28.657,90.943 30.939,88.661 R9.2@30.939,85.654
USB_DN: D3.2 Type_C1.A7 Type_C1.B7 U2.5 | length 129.5
  Top Layer w0.254: D3.2@40.83,96.4 40.9,96.33 40.95,96.33 v1(43.48,93.8) ; D3.2@40.953,96.523 41.706,97.276 41.706,98.8 42.159,99.253 42.159,100.067 Type_C1.B7@42.192,100.1 42.115,100.177 42.115,100.685 42.1,100.7 42.1,100.951 41.951,101.1 41.325,101.1 41.176,100.951 Type_C1.A7@41.176,100.1
  Bottom Layer w0.254: v1(43.48,93.8) 45,93.8 61.227,77.573 66.427,77.573 78.6,65.401 78.6,65.301 78.654,65.247 78.654,58.347 75.7,55.393 75.7,46.221 75.492,46.013 75.492,18.009 77.701,15.8 86.999,15.8 88.546,17.347 88.546,20.753 87.899,21.4 86.049,21.4 85.9,21.549 85.9,21.6 85.049,22.451 U2.5@85.049,23.448
USB_DP: D4.2 Type_C1.A6 Type_C1.B6 U2.4 | length 132.4
  Top Layer w0.254: Type_C1.B6@40.668,100.1 40.668,99.249 ; v1(40.9,93) 38.4,95.5 D4.2@38.4,96.4 38.4,96.981 40.668,99.249 ; Type_C1.A6@41.68,100.1 41.649,100.069 41.649,99.549 41.349,99.249 40.668,99.249
  Bottom Layer w0.254: v1(40.9,93) 44.5,93 69.056,68.444 74.956,68.444 78.3,65.1 78.3,58.493 75.138,55.331 75.138,17.863 77.555,15.446 87.146,15.446 88.9,17.2 88.9,20.9 87.8,22 86.1,22 85.549,22.551 U2.4@85.549,23.448
USIM_CLK: C46.1 R64.1 U6.32 | length 74.7
  Top Layer w0.254: C46.1@22.3,33.5 22.3,31.3 22.343,31.257 R64.1@22.343,29.161 25.06,29.161 25.13,29.231 36.976,29.231 37.047,29.161 50.811,29.161 53.031,31.381 74.682,31.381 75.519,32.218 75.519,36.865 77.635,38.981 79.081,38.981 79.8,39.7 79.8,43.089 80.8,44.089 U6.32@81.3,44.089
  Top Layer w0.6: C46.1@22.3,33.5 22.554,33.754 C46.1@22.554,33.854
USIM_DATA: C45.1 R63.1 U6.31 | length 81.7
  Top Layer w0.254: R63.1@22.117,42.634 22.117,38.132 C45.1@22.246,38.003 22.246,37.903 23.8,36.349 23.8,31.6 25.815,29.585 37.123,29.585 37.193,29.515 50.665,29.515 52.885,31.735 74.536,31.735 75.165,32.364 75.165,37.012 77.488,39.335 78.934,39.335 79.446,39.847 79.446,43.236 80.273,44.063 80.273,44.469 80.627,44.823 80.894,45.089 U6.31@81.3,45.089 ; R63.1@22.417,42.534 R63.1@22.543,42.661
USIM_RST: C47.1 R65.1 U6.33 | length 77.6
  Top Layer w0.254: C47.1@20.454,19.897 20.454,19.997 22.343,21.885 R65.1@22.343,24.461 22.343,25.943 25.277,28.877 36.83,28.877 36.907,28.8 50.951,28.8 53.178,31.027 74.829,31.027 75.873,32.071 75.873,36.718 77.782,38.627 79.627,38.627 80.2,39.2 80.2,42.489 80.8,43.089 U6.33@81.3,43.089
USIM_VDD: C48.1 C49.1 S1.1 U6.30 | length 110.9
  Top Layer w0.254: S1.1@16.3,30.82 16.05,30.82 14.3,32.57 14.3,41.9 15.4,43 15.4,46.449 16.497,47.546 C48.1@16.597,47.546 C49.1@22.197,47.546 22.297,47.546 24.1,45.742 24.1,39.998 24.154,39.944 24.154,31.747 25.962,29.939 37.27,29.939 37.34,29.869 50.518,29.869 52.738,32.089 74.389,32.089 74.811,32.511 74.811,37.158 77.342,39.689 78.788,39.689 79.092,39.993 79.092,43.382 79.919,44.21 79.919,45.208 80.8,46.089 U6.30@81.3,46.089
VBUSA: C15.1 C16.1 D1.1 D2.2 R24.1 Type_C1.A4 Type_C1.A9 Type_C1.B4 Type_C1.B9 U2.7 | length 143.7
  Top Layer w0.254: Type_C1.B9@43.716,100.1 43.716,100.471 43.97,100.725 ; D2.2@44.842,96.579 43.97,97.45 Type_C1.A4@43.97,100.1 43.97,100.725 ; v2(76.25,57.55) 77.249,57.55 78,56.799 v2@78,46.825 ; v1(87.441,17.753) v1@89.853,17.753 ; Type_C1.B4@39.144,100.354 Type_C1.A9@38.89,100.1 Type_C1.B4@39.144,100.1 Type_C1.B4@39.144,100.354 ; Type_C1.B4@39.144,100.354 39.144,100.471 39.2,100.527 39.2,100.9 39.9,101.6 43.3,101.6 43.97,100.93 43.97,100.725
  Top Layer w0.6: D2.2@44.965,96.456 46.42,95 47.1,94.32 47.1,83.3 D1.1@44.3,80.5 44.3,79.1 45.6,77.8 v1(46.2,77.8)
  Bottom Layer w0.254: v1(46.2,77.8) 58.9,77.8 68.75,67.95 74.95,67.95 77.946,64.953 77.946,59.246 v2(76.25,57.55) ; v2(78,46.8) 77.933,46.8 76.2,45.067 76.2,19.676 76.254,19.622 76.254,19.046 77.2,18.1 78.8,18.1 79.292,18.592 R24.1@79.292,19.704 80.396,18.6 83.436,18.6 C15.1@84.604,19.768 ; U2.7@84.049,23.448 84.049,21.651 84.604,21.096 C15.1@84.604,19.768 ; v1@87.4,17.8 86.472,17.8 84.868,19.404 84.604,19.404 C15.1@84.604,19.768 ; v1(89.894,17.706) 91.023,18.836 91.023,19.387 C16.1@91.404,19.768
VDD_EXT_1V8: C43.1 C50.2 R61.2 R66.1 R67.1 U6.15 | length 136.3
  Top Layer w0.254: R61.2@81.054,22.339 81.054,22.239 R61.2@81.146,22.148 ; C43.1@81.146,19.603 R61.2@81.146,22.148 ; U6.15@87.3,62.089 87.3,62.624 87.622,62.946 87.847,62.946 90.2,65.299 90.2,68.424 91.386,69.61 104.091,69.61 107.389,66.312 107.389,38.432 106.034,37.077 106.034,36.866 107.462,35.439 107.462,29.86 105.773,28.171 105.773,26.427 106.966,25.234 106.966,15.727 106.699,15.46 100.49,15.46 99.8,16.15 99.8,26.7 99,27.5 97,27.5 96.371,26.871 96.371,26.122 R67.1@96.554,25.939 96.4,25.785 96.4,22.351 96.276,22.227 96.276,22.127 95.803,21.654 95.603,21.654 94.449,20.5 91.173,20.5 90.38,21.293 R66.1@90.38,25.565 ; R66.1@90.754,25.939 90.754,25.839 90.43,25.515 89.1,24.185 89.1,21.2 86.854,18.954 84.44,18.954 81.627,21.766 81.527,21.766 R61.2@81.146,22.148
W5500_CS: ESP1.19 JP3.5 JP9.9 U5.32 | length 133
  Top Layer w0.254: JP9.9@4.62,46.54 3.593,45.513 1.387,45.513 0.9,46 0.9,47.4 3.346,49.846 3.346,61.49 4,62.144 4,65.2 5.6,66.8 11.6,66.8 12.354,67.554 12.354,70.453 14.901,73 16.1,73 16.12,73.02 16.139,73.02 16.829,73.711 16.829,74.689 16.139,75.379 15.72,75.379 14.3,76.8 U5.32@14.3,78.3
  Top Layer w0.6: ESP1.19@67.75,44.47 72.786,44.47 73.976,43.28 JP3.5@74,43.28
  Bottom Layer w0.254: JP9.9@4.62,46.54 4.62,46.42 4.527,46.327 4.527,45.359 3.593,44.425 3.593,43.575 5.376,41.792 15.672,41.792 20.427,46.547 70.513,46.547 JP3.5@73.7,43.36
XI: C32.2 R51.1 U5.30 Y1.1 | length 15.4
  Top Layer w0.254: C32.2@2.403,69.754 2.415,69.743 6.337,69.743 6.81,70.216 6.81,70.316 10.694,74.2 10.8,74.2 13.3,76.7 U5.30@13.3,78.3
XO: C31.2 U5.31 Y1.2 | length 14.6
  Top Layer w0.254: C31.2@10.039,67.846 10.139,67.846 12,69.707 12,70.6 15.6,74.2 16.35,74.2 13.8,76.75 U5.31@13.8,78.3
pads on no net: CN1. CN1.7 CN1.8 ESP1.30 ESP1.31 ESP1.32 JP9.1 pp1.0 R51.2 S1. S1.4 Type_C1. Type_C1.A8 Type_C1.B8 U2.1 U2.2 U2.10 U2.11 U2.12 U2.13 U2.14 U2.15 U2.16 U2.17 U2.18 U2.19 U2.20 U2.21 U2.23 U2.27 U3.9 U4.6 U5.7 U5.12 U5.13 U5.18 U5.24 U5.26 U5.46 U5.47 U6.3 U6.4 U6.5 U6.6 U6.7 U6.8 U6.11 U6.12 U6.13 U6.14 U6.17 U6.19 U6.20 U6.21 U6.22 U6.23 U6.24 U6.25 U6.26 U6.27 U6.28 U6.34 U6.35 U6.36 U6.37 U6.38 U6.39 U6.40 U6.41 U6.42 U6.43 U6.44 U6.45 U6.46 U6.47 U6.48 U6.49 U6.50 U6.51 U6.52 U6.53 U6.60 U6.62 U6.63 U6.64 U6.65 U6.66 U6.67 U6.68 U6.69 U6.70 U6.71 U6.72 U6.73 U6.74 U6.75 U6.76 U6.77 U6.78 U6.79 U6.80 U6.81 U6.82 U6.83 U6.84 U6.85 U6.86 U6.87 U6.88 U6.92 U6.93 U6.94 U6.95 U6.96 U6.97 U6.98 U6.99 U6.100 U6.101 U6.102 U6.103 U6.104 U6.105 U6.106 U6.107 U6.108 U6.109 U6.110 U6.111 U6.112 U6.113 U6.114 U6.115 U6.116 U6.117 U6.118 U6.119 U6.120 U6.121 U6.122 U6.123 U6.124 U6.125 U6.126 U6.127 U6.128 U6.129 U6.130

## Polygon pours and split planes (outlines as drawn)
GND on Bottom Layer "NONET_L-01_P-001" (solid, pour order 3): 10,107.9 10.133,107.77 73,107.77 73,69.15 108,69.15 108,9.95 107.98,9.93 102.99,9.93 102.91,9.85 102.18,9.85 102.04,9.71 101.56,9.71 101.34,9.49 100.99,9.49 100.73,9.23 100.49,9.23 100.22,8.96 100.07,8.96 99.7,8.59 99.62,8.59 99.27,8.24 98.9,7.86 98.9,7.76 98.64,7.5 98.64,7.33 98.4,7.09 98.4,6.55 98.24,6.39 98.24,6.05 98.11,5.92 98.11,5.32 98.02,5.23 98.02,4.63 98.01,4.62 98.01,-0.06 10.01,-0.06 10.01,0.96 10,0.97 10,4.46 9.995,5.675 9.99,5.79 9.89,5.89 9.89,6.36 9.67,6.58 9.67,6.89 9.48,7.08 9.48,7.32 8.77,8.03 8.77,8.16 8.33,8.6 8.18,8.6 7.4,9.38 7.16,9.38 6.87,9.67 5.88,9.67 5.73,9.82 5.23,9.82 5.16,9.89 0.02,9.89 0.02,97.89 3.74,97.89 3.75,97.9 6.08,97.9 6.27,98.09 6.68,98.09 7.1,98.51 7.36,98.51 7.61,98.76 7.78,98.76 8.11,99.09 8.24,99.09 8.76,99.61 8.76,99.73 9.15,100.12 9.15,100.35 9.48,100.68 9.48,100.95 9.68,101.15 9.68,101.56 9.87,101.75 9.87,102.3 9.98,102.41 9.98,103.41 10.02,103.45 10,103.47
GND on Top Layer "NONET_L-01_P-001" (solid, pour order 2): 72.29,107.9 73,107.19 73,69.18 108,69.18 108,9.96 107.97,9.93 103.11,9.93 103.1,9.94 102.66,9.94 102.63,9.91 102.09,9.91 101.91,9.73 101.46,9.73 101.13,9.4 100.74,9.4 100.29,8.95 99.97,8.95 99.58,8.56 99.19,8.17 98.82,7.79 98.82,7.65 98.46,7.29 98.46,7.02 98.21,6.77 98.21,5.82 98.07,5.68 98.07,5.05 98.01,4.99 98.01,3.99 97.99,3.97 97.99,2.77 98.01,2.75 98.01,-0.05 10.01,-0.05 10.01,5.73 9.89,5.85 9.89,6.32 9.63,6.58 9.63,6.82 9.39,7.06 9.39,7.27 9.07,7.59 9.07,7.86 8.32,8.61 7.96,8.96 7.88,8.96 7.48,9.36 7.12,9.36 6.86,9.62 6.53,9.62 6.34,9.81 5.87,9.81 5.78,9.9 4.51,9.9 4.49,9.88 0.03,9.88 0.03,97.9 0.05,97.92 5.77,97.92 5.84,97.99 6.21,97.99 6.32,98.1 6.67,98.1 6.85,98.28 7.15,98.28 7.42,98.55 7.63,98.55 8.45,99.37 8.52,99.37 9.08,99.93 9.08,100.03 9.42,100.37 9.42,100.59 9.73,100.9 9.73,101.29 9.93,101.49 9.93,102.04 10.01,102.12 10.01,102.66 10.02,102.67 10.02,103.23 10.006,103.244 10.006,107.897

## Keep-outs
Keep-Out Layer:
  lines w0.254: 0.025,9.884 0.025,97.925 ; 0.032,9.884 4.995,9.893 cw(c4.962,4.869) 9.986,4.906 ; 0.084,97.893 5.031,97.914 ccw(c4.994,102.938) 10.017,102.905 ; 9.992,4.8 10.013,0 98,0 ; 10.017,103.005 10.009,107.9 98,107.9 ; 97.993,107.841 98.014,102.894 ccw(c103.038,102.931) 103.005,97.907 107.968,97.916 ; 98,4.8 98.009,0 ; 98.007,4.94 cw(c103.031,4.907) 102.994,9.93 108,9.951 108,97.9

## Text inside footprints (layer, text, board x,y; h text height)
pp1: Top Overlay "INPUT" at 0.554,59.7 h1 r270
U1: Top Overlay "1" at 71.745,86.218 h1 r180